# Altium PCB IG-1.PCBDOC (part 2 of 3)
Units mil, origin at the board's own origin, x right, y up, seen from the top; angles counter-clockwise.
Board outline 2566.93 x 964.57 mil, 4 copper layers (Top, GND Plane, Mid1-Ver, Bottom), stack 61.6 mil thick; 41 components, 41 nets, 557 pads, 344 vias.
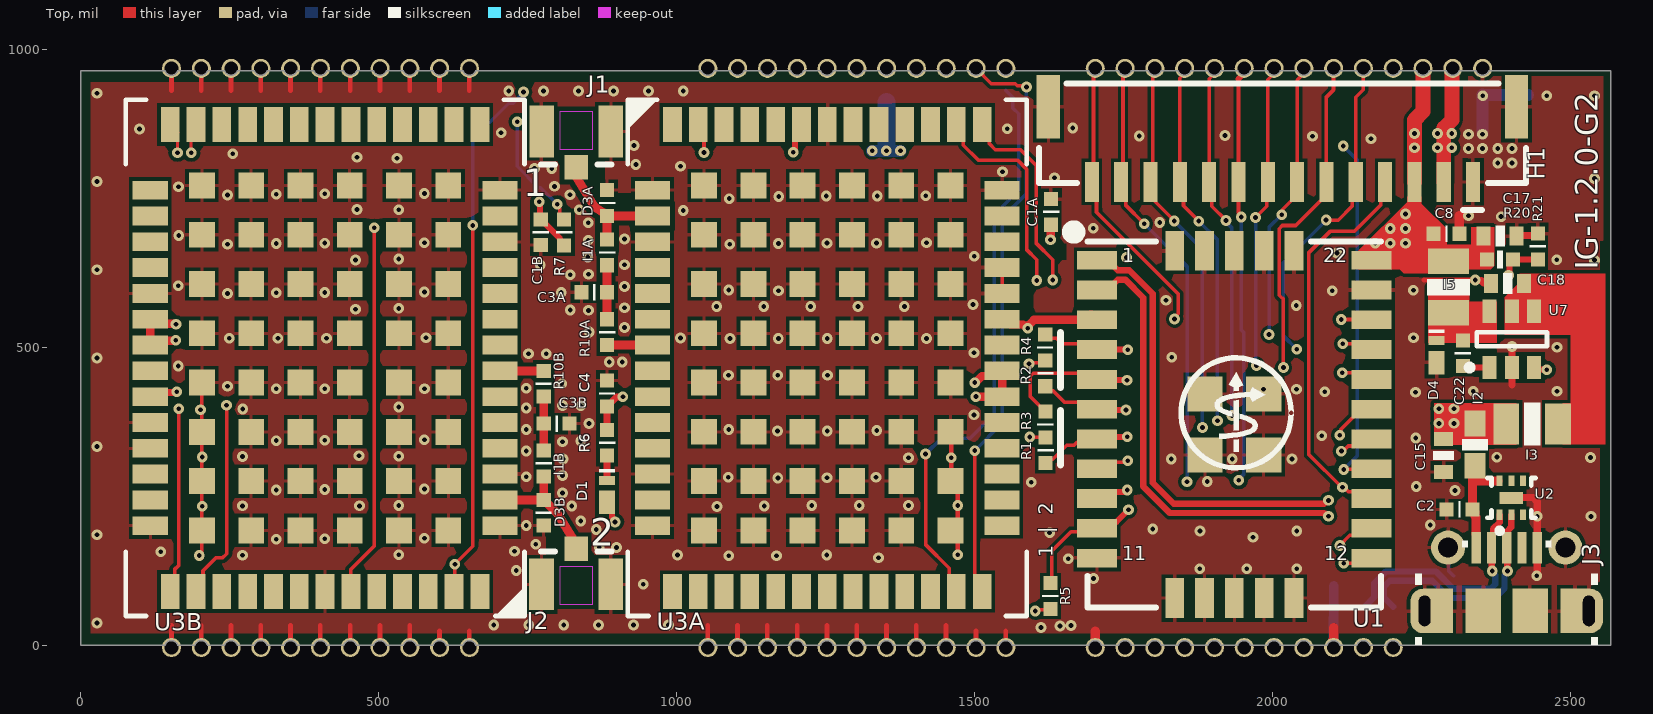
[diagram p0: Top view]

## Via types
v1: diameter 18, hole 8, Top to Bottom, 344 vias

## Nets (pads, with @x,y where several pads share a name; then routed paths per layer and width w, separated by ;. In a path a pad name is that pad's centre, name@x,y a point inside that pad or via, vN(x,y) a via of type N, cw(c..) or ccw(c..) an arc to the next point about the centre after c; other vN are vias at no path point) (continued)
G4/Rx0: (continued)
  Bottom w6: v1@1971.13,471.4 v1@1971.13,718.18
  other v1: 1971.13,718.04
G5/SCLK/STROBE: H1.9 U1.9 U4.9 | length 970.1
  Top w6: 1942.4,950.66 H1.9@1942.4,777.61 1942.5,777.5 1942.5,726.16 1947.16,721.5 v1(1947.16,718.79) ; v1@1942.6,277.28 v1(1942.81,277.08)
  Top w10: U1.9@1698.27,246.33 1709.01,257.08 1750.2,257.08 1753.72,260.6 v1(1755.89,260.6) ; 1942.4,950.66 1951.87,960.14 U4.9@1951.87,966.09
  Mid1-Ver w6: v1(1755.89,260.6) 1772.04,260.6 1804.29,292.85 1927.04,292.85 v1(1942.81,277.08)
  Bottom w6: v1@1942.81,277.49 1942.81,278.64 1950.94,286.76 1950.94,525.26 1947.16,529.04 v1(1947.16,718.79)